# Altium PCB Robot_POWER.PcbDoc (part 3 of 3)
Units mil, origin at the board's own origin, x right, y up, seen from the top; angles counter-clockwise.
Board outline 5791.97 x 4531.5 mil, 4 copper layers (Top Layer, GND02, GND03, Bottom Layer), stack 23.756 mil thick; 192 components, 81 nets, 533 pads, 1202 vias.
Unrouted connection lines stored in the file: 18.
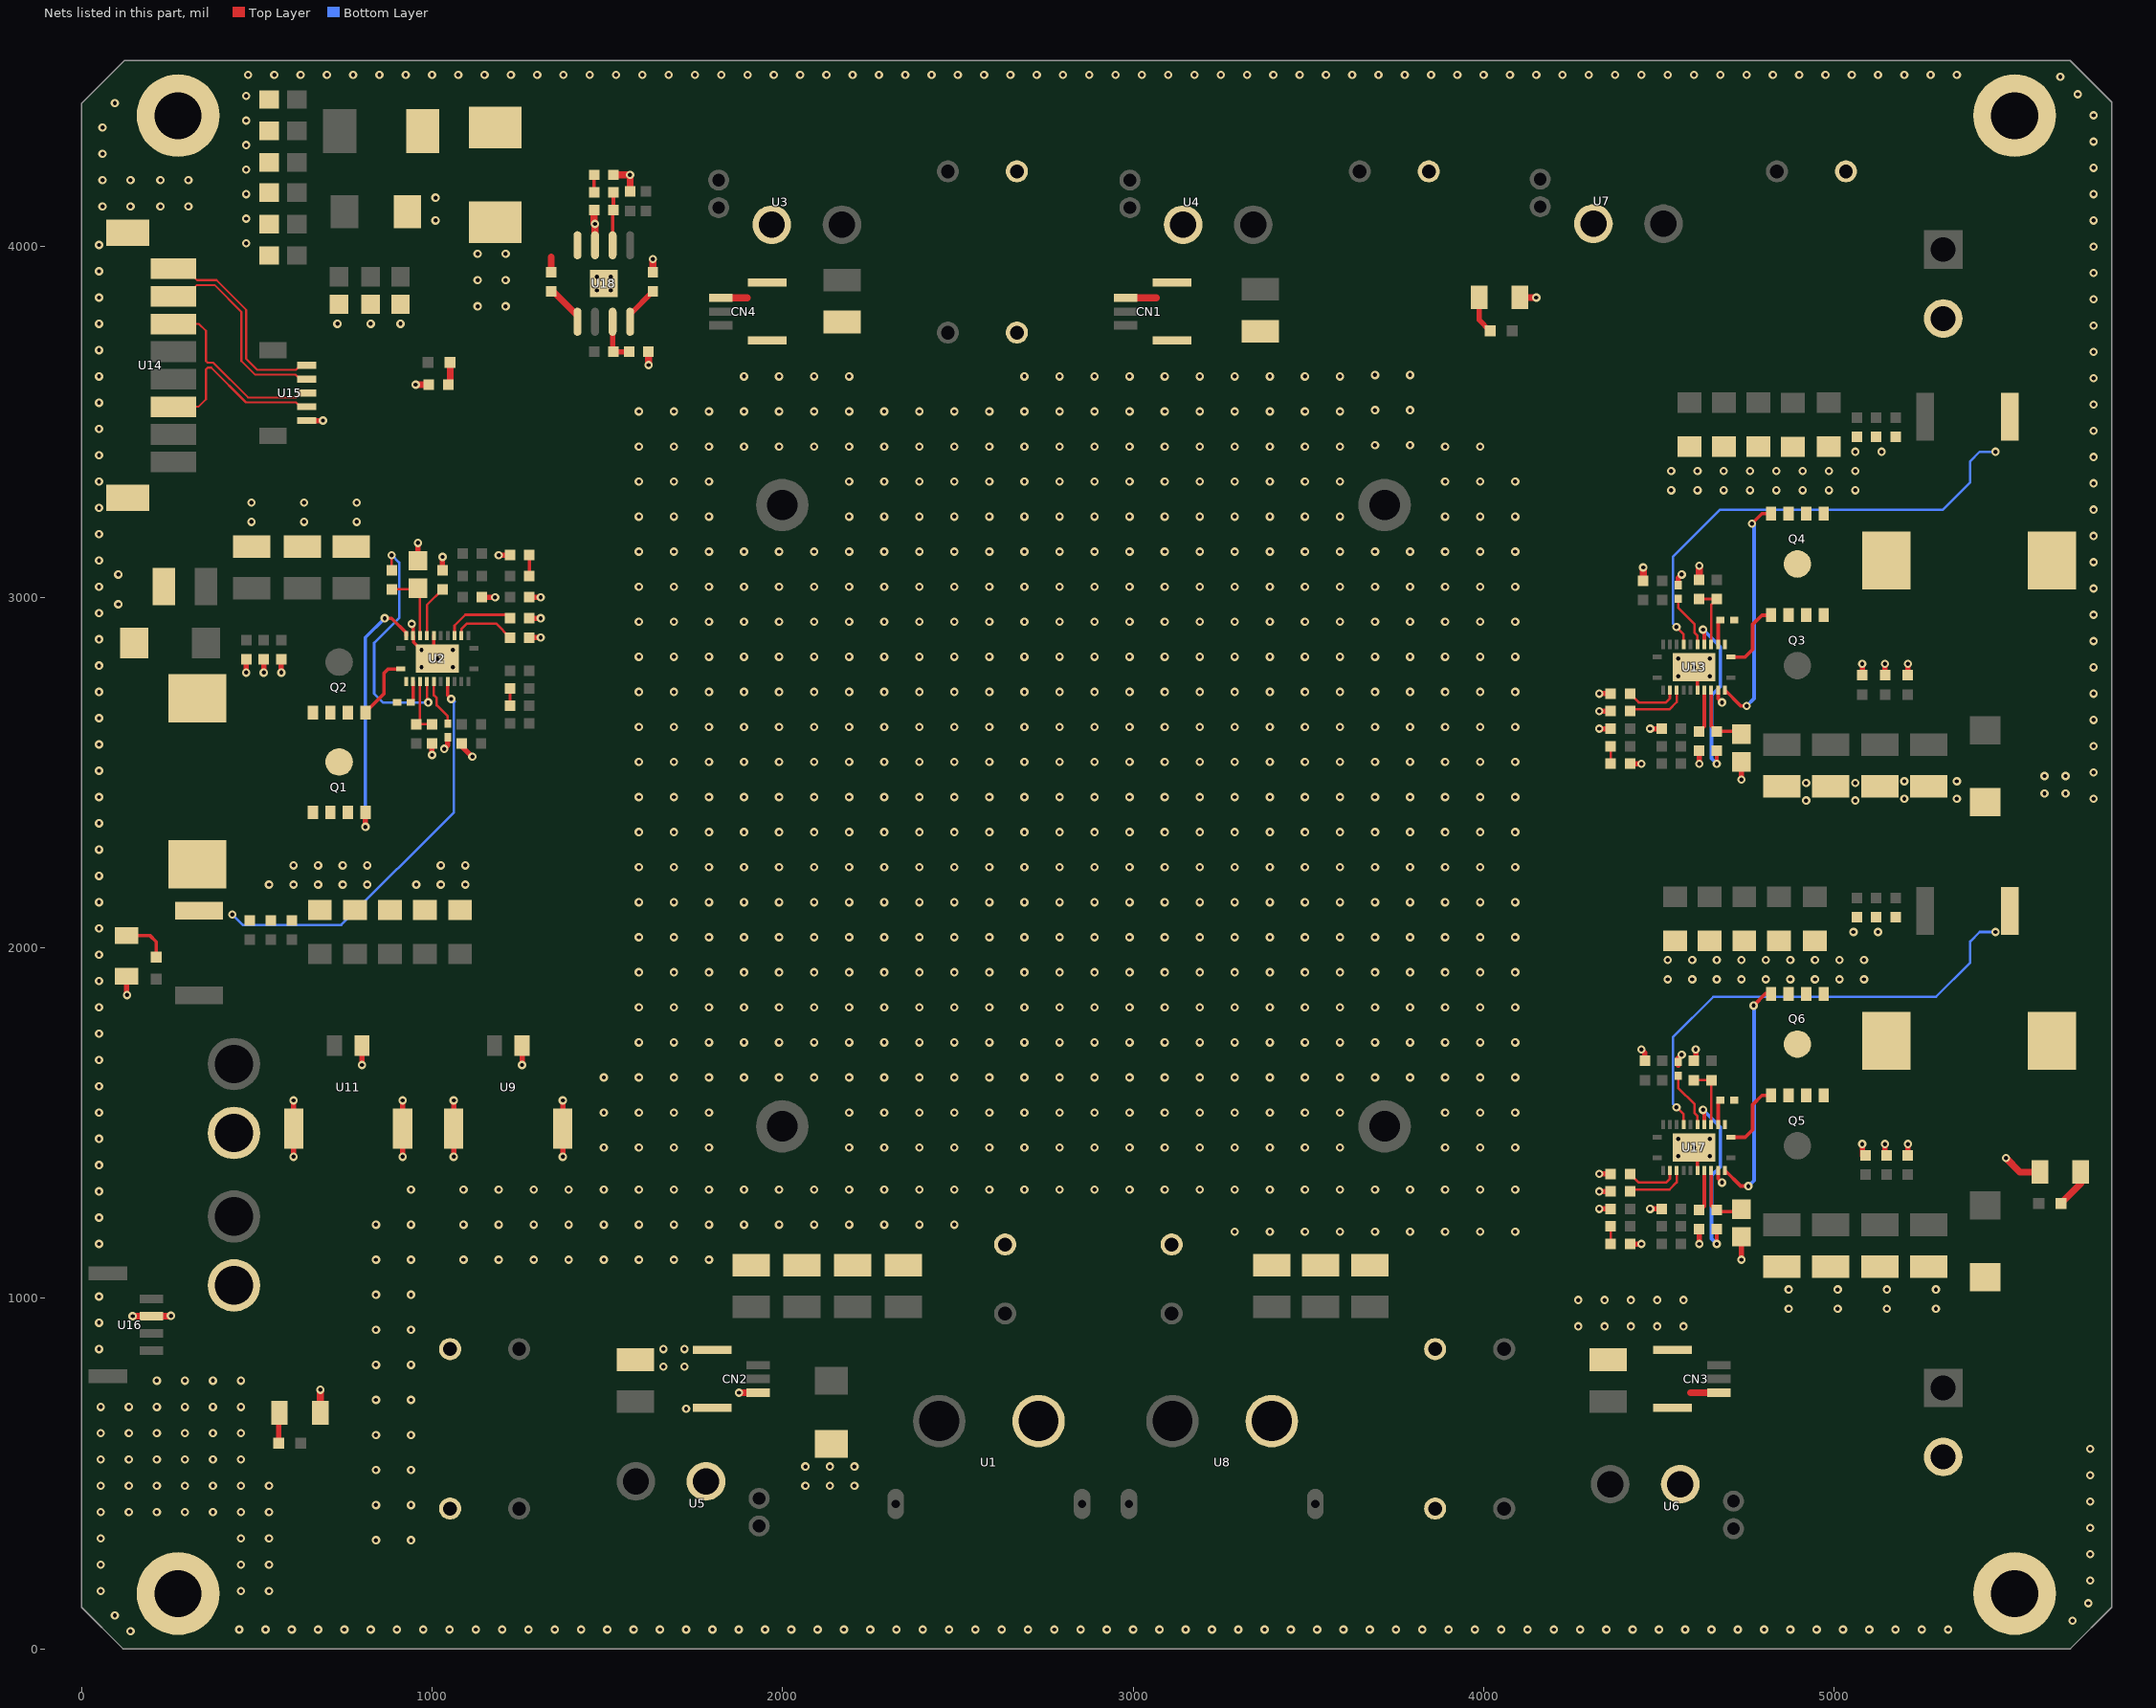
[diagram p4: the nets of this part, all layers, seen from the top]

## Via types
v1: diameter 24, hole 12, Top Layer to Bottom Layer, tented both sides, 1202 vias

## Nets (pads, with @x,y where several pads share a name; then routed paths per layer and width w, separated by ;. In a path a pad name is that pad's centre, name@x,y a point inside that pad or via, vN(x,y) a via of type N, cw(c..) or ccw(c..) an arc to the next point about the centre after c; other vN are vias at no path point) (continued)
GND: C2.1 C3.1 C4.1 C5.1 C6.1 C7.1 C8.1 C9.1 C10.1 C11.1 C12.1 C13.2 C14.2 C15.2 C16.2 C17.2 C18.2 C19.2 C20.2 C21.2 C22.2 C23.2 C24.1 C25.1 C26.2 C27.2 C28.2 C29.2 C30.1 C32.1 C33.1 C34.1 C35.2 C36.2 C37.2 C38.2 C39.2 C40.2 C42.2 C43.1 C44.2 C45.1 C46.1 C47.2 C48.2 C49.2 C50.2 C51.1 C53.1 C54.1 C55.1 C56.2 C57.2 C58.2 C59.2 C60.2 C61.2 C62.2 C64.1 C65.2 C66.1 C67.1 C68.2 C69.2 C70.2 C71.2 C72.1 C75.1 C76.1 C77.1 C78.2 C79.2 C80.2 C81.2 C82.2 C83.1 C84.1 C85.1 C86.1 C87.1 C88.1 C89.1 C90.1 C91.1 C92.2 C94.2 C95.1 C96.1 C97.1 CN1.1 CN1.4 CN1.5 CN2.1 CN2.4 CN2.5 CN3.1 CN3.4 CN3.5 CN4.1 CN4.4 CN4.5 D1.2 D2.2 D3.2 D4.2 D5.2 D6.1 pad.0 Q1.1 Q1.2 Q1.3 Q4.1 Q4.2 Q4.3 Q6.1 Q6.2 Q6.3 R8.2 R11.2 R12.1 R13.2 R14.2 R15.2 R21.2 R22.2 R24.1 R25.2 R26.2 R27.2 R28.2 R29.2 R30.2 R31.2 R32.2 R37.2 R43.2 R44.1 R45.1 R46.1 R47.1 R48.2 R49.2 R50.2 U1.1 U2.7 U2.10 U2.25 U3.2 U4.2 U5.2 U6.2 U7.2 U8.1 U9.2 U9.3 U9.4 U10.1 U11.2 U11.3 U11.4 U12.2 U13.7 U13.10 U13.25 U14.9 U14.10 U15.1 U16.2 U17.7 U17.10 U17.25 U18.7 U18.9 U19.2 U20.1 | length 3597.9
  Top Layer w10: v1(942.3,2923.9) 946.1,2923.9 U2.10@946.1,2890.2 947.3,2889 947.3,2871.72 985.97,2833.05 U2.25@1003.25,2833.05 ; U2.25@1005.1,2834.9 U2.7@1005.1,2890.2 ; v1(4600,1430) 4609.9,1420.1 U17.7@4609.9,1364.8 ; v1(4600,2800) 4609.9,2790.1 U13.7@4609.9,2734.8 ; U17.10@4668.9,1364.8 4668.9,1341.1 v1(4680,1330) ; U13.10@4668.9,2734.8 4668.9,2711.1 v1(4680,2700)
  Top Layer w15: v1@128.05,1866.99 R30.2@128.05,1918.79 ; v1(470,2785) C25.1@470,2822.5 ; v1(520,2785) C24.1@520,2822.5 ; v1(570,2785) C30.1@570,2822.5 ; v1(605.18,1403.7) U11.3@605.21,1484.25 v1(605.21,1564.58) ; U15.1@642.69,3503.98 v1(688.98,3503.98) ; v1(800.09,1665.54) U11.2@800.09,1720.47 ; v1(916.2,1403.7) U11.4@916.23,1484.25 v1(916.23,1564.58) ; C23.2@960,3104.37 v1(960,3155) ; v1(999.99,2550.01) R12.1@1000,2582.5 ; C43.1@1030,3077.5 v1(1030,3115) ; v1(1034.71,2567.54) 1045,2577.83 R11.2@1045,2600.31 ; v1(1061.87,1403.7) U9.3@1061.9,1484.25 v1(1061.9,1564.58) ; R8.2@1085,2582.5 1085,2575 v1(1115,2545) ; R13.2@1142.5,3000 v1(1180,3000) ; v1(1190,3120) C40.2@1222.5,3120 ; v1(1256.78,1665.54) U9.2@1256.78,1720.47 ; R14.2@1277.5,2885 v1(1310,2885) ; R15.2@1277.5,2940 v1(1310,2940) ; C42.2@1277.5,3000 v1(1310,3000) ; v1(1372.89,1403.7) U9.4@1372.92,1484.25 v1(1372.92,1564.58) ; v1(4330,1255) C94.2@4362.5,1255 ; v1(4330,1305) R50.2@4362.5,1305 ; v1(4330,1355) R49.2@4362.5,1355 ; v1(4330,2625) C62.2@4362.5,2625 ; v1(4330,2675) R28.2@4362.5,2675 ; v1(4330,2725) R27.2@4362.5,2725 ; C92.2@4417.5,1155 v1(4450,1155) ; C61.2@4417.5,2525 v1(4450,2525) ; v1(4450,1710) 4460,1700 R37.2@4460,1677.5 ; v1(4475,1255) R48.2@4507.5,1255 ; v1(4475,2625) R25.2@4507.5,2625 ; R43.2@4555,1664.69 4555,1685 v1(4565,1695) ; R22.2@4555,3034.69 4555,3055 v1(4565,3065) ; R45.1@4600,1677.5 4605,1682.51 v1(4605,1710) ; v1(4615,1155) C97.1@4615,1192.5 ; v1(4615,2525) C64.1@4615,2562.5 ; v1(4735,1110) C65.2@4735,1160.63 ; v1(4735,2480) C44.2@4735,2530.63 ; C72.1@5080,1407.5 v1(5080,1440) ; C45.1@5080,2777.5 v1(5080,2810) ; C66.1@5145,1407.5 v1(5145,1440) ; C51.1@5145,2777.5 v1(5145,2810) ; C67.1@5210,1407.5 v1(5210,1440) ; C46.1@5210,2777.5 v1(5210,2810)
  Top Layer w20: v1(146.02,948.98) U16.2@199.81,948.98 253.98,948.98 v1(255,950) ; R26.2@681.1,673.23 v1(681.1,738.9) ; v1(953.51,3606.49) R29.2@991,3606.49 ; C95.1@1462.5,4105 1462.5,4067.5 v1(1465,4065) U18.7@1465,4004.1 ; C96.1@1517.5,4205 v1(1565,4204.99) R46.1@1565,4157.5 ; v1(1617.5,3662.5) R47.1@1617.5,3700 ; R44.1@1630,3927.5 v1(1630,3965) ; CN4.1@1824.05,3854.37 1899.37,3854.37 ; v1(1875.63,730.63) CN2.1@1930.95,730.63 ; CN1.1@2979.06,3854.37 3065.63,3854.37 ; R31.2@4103.2,3855 v1(4150,3855) ; R21.2@4455,3047.5 v1(4455,3085) ; 4590.63,730.63 CN3.1@4670.94,730.63 ; R24.1@4615,3050 v1(4615,3090) ; v1(5490,1400) 5530,1360 R32.2@5586.8,1360
  Bottom Layer w10: v1(942.3,2923.9) v1@943.9,2923.9
  other v1: 140,50 450,55 525,55 600,55 675,55 750,55 825,55 900,55 975,55 1050,55 1125,55 1200,55 1275,55 1350,55 1425,55 1500,55 1575,55 1650,55 1725,55 1800,55 1875,55 1950,55 2025,55 2100,55 2175,55 2250,55 2325,55 2400,55 2475,55 2550,55 2625,55 2700,55 2775,55 2850,55 2925,55 3000,55 3075,55 3150,55 3225,55 3300,55 3375,55 3450,55 3525,55 3600,55 3675,55 3750,55 3825,55 3900,55 3975,55 4050,55 4125,55 4200,55 4275,55 4350,55 4425,55 4500,55 4575,55 4650,55 4725,55 4800,55 4875,55 4950,55 5025,55 5100,55 5175,55 5250,55 5325,55 5680,80 95,95 5725,130 55,165 455,165 535,165 5730,195 55,240 455,240 535,240 5730,270 840,310 940,310 55,315 455,315 535,315 5730,345 55,390 135,390 215,390 295,390 375,390 455,390 535,390 840,410 940,410 5730,420 55,465 135,465 215,465 295,465 375,465 455,465 535,465 2065,465 2135,465 2205,465 5730,495 840,510 940,510 2065,520 2135,520 2205,520 55,540 135,540 215,540 295,540 375,540 455,540 5730,570 840,610 940,610 55,615 135,615 215,615 295,615 375,615 455,615 1725,685 55,690 135,690 215,690 295,690 375,690 455,690 840,710 940,710 215,765 295,765 375,765 455,765 1660,805 1720,805 840,810 940,810 50,855 1660,855 1720,855 840,910 940,910 4270,920 4345,920 4420,920 4495,920 4570,920 50,930 4870,970 5010,970 5150,970 5290,970 4270,995 4345,995 4420,995 4495,995 4570,995 50,1005 840,1010 940,1010 4870,1025 5010,1025 5150,1025 5290,1025 840,1110 940,1110 1090,1110 1190,1110 1290,1110 1390,1110 1490,1110 1590,1110 1690,1110 1790,1110 50,1155 3290,1190 3390,1190 3490,1190 3590,1190 3690,1190 3790,1190 3890,1190 3990,1190 4090,1190 840,1210 940,1210 1090,1210 1190,1210 1290,1210 1390,1210 1490,1210 1590,1210 1690,1210 1790,1210 1890,1210 1990,1210 2090,1210 2190,1210 2290,1210 2390,1210 2490,1210 50,1230 50,1305 940,1310 1090,1310 1190,1310 1290,1310 1390,1310 1490,1310 1590,1310 1690,1310 1790,1310 1890,1310 1990,1310 2090,1310 2190,1310 2290,1310 2390,1310 2490,1310 2590,1310 2690,1310 2790,1310 2890,1310 2990,1310 3090,1310 3190,1310 3290,1310 3390,1310 3490,1310 3590,1310 3690,1310 3790,1310 3890,1310 3990,1310 4090,1310 50,1380 4555,1405 4645,1405 1490,1430 1590,1430 1690,1430 1790,1430 2190,1430 2290,1430 2390,1430 2490,1430 2590,1430 2690,1430 2790,1430 2890,1430 2990,1430 3090,1430 3190,1430 3290,1430 3390,1430 3490,1430 3590,1430 3890,1430 3990,1430 4090,1430 50,1455 4555,1455 4645,1455 50,1530 1490,1530 1590,1530 1690,1530 1790,1530 2190,1530 2290,1530 2390,1530 2490,1530 2590,1530 2690,1530 2790,1530 2890,1530 2990,1530 3090,1530 3190,1530 3290,1530 3390,1530 3490,1530 3590,1530 3890,1530 3990,1530 4090,1530 50,1605 1490,1630 1590,1630 1690,1630 1790,1630 1890,1630 1990,1630 2090,1630 2190,1630 2290,1630 2390,1630 2490,1630 2590,1630 2690,1630 2790,1630 2890,1630 2990,1630 3090,1630 3190,1630 3290,1630 3390,1630 3490,1630 3590,1630 3690,1630 3790,1630 3890,1630 3990,1630 4090,1630 50,1680 1590,1730 1690,1730 1790,1730 1890,1730 1990,1730 2090,1730 2190,1730 2290,1730 2390,1730 2490,1730 2590,1730 2690,1730 2790,1730 2890,1730 2990,1730 3090,1730 3190,1730 3290,1730 3390,1730 3490,1730 3590,1730 3690,1730 3790,1730 3890,1730 3990,1730 4090,1730 50,1755 50,1830 1590,1830 1690,1830 1790,1830 1890,1830 1990,1830 2090,1830 2190,1830 2290,1830 2390,1830 2490,1830 2590,1830 2690,1830 2790,1830 2890,1830 2990,1830 3090,1830 3190,1830 3290,1830 3390,1830 3490,1830 3590,1830 3690,1830 3790,1830 3890,1830 3990,1830 4090,1830 130,1865 50,1905 4525,1910 4595,1910 4665,1910 4735,1910 4805,1910 4875,1910 4945,1910 5015,1910 5085,1910 1590,1930 1690,1930 1790,1930 1890,1930 1990,1930 2090,1930 2190,1930 2290,1930 2390,1930 2490,1930 2590,1930 2690,1930 2790,1930 2890,1930 2990,1930 3090,1930 3190,1930 3290,1930 3390,1930 3490,1930 3590,1930 3690,1930 3790,1930 3890,1930 3990,1930 4090,1930 4525,1965 4595,1965 4665,1965 4735,1965 4805,1965 4875,1965 4945,1965 5015,1965 5085,1965 50,1980 1590,2030 1690,2030 1790,2030 1890,2030 1990,2030 2090,2030 2190,2030 2290,2030 2390,2030 2490,2030 2590,2030 2690,2030 2790,2030 2890,2030 2990,2030 3090,2030 3190,2030 3290,2030 3390,2030 3490,2030 3590,2030 3690,2030 3790,2030 3890,2030 3990,2030 4090,2030 5055,2045 5125,2045 50,2055 50,2130 1590,2130 1690,2130 1790,2130 1890,2130 1990,2130 2090,2130 2190,2130 2290,2130 2390,2130 2490,2130 2590,2130 2690,2130 2790,2130 2890,2130 2990,2130 3090,2130 3190,2130 3290,2130 3390,2130 3490,2130 3590,2130 3690,2130 3790,2130 3890,2130 3990,2130 4090,2130 535,2180 605,2180 675,2180 745,2180 815,2180 955,2180 1025,2180 1095,2180 50,2205 1590,2230 1690,2230 1790,2230 1890,2230 1990,2230 2090,2230 2190,2230 2290,2230 2390,2230 2490,2230 2590,2230 2690,2230 2790,2230 2890,2230 2990,2230 3090,2230 3190,2230 3290,2230 3390,2230 3490,2230 3590,2230 3690,2230 3790,2230 3890,2230 3990,2230 4090,2230 605,2235 675,2235 745,2235 815,2235 1025,2235 1095,2235 50,2280 1590,2330 1690,2330 1790,2330 1890,2330 1990,2330 2090,2330 2190,2330 2290,2330 2390,2330 2490,2330 2590,2330 2690,2330 2790,2330 2890,2330 2990,2330 3090,2330 3190,2330 3290,2330 3390,2330 3490,2330 3590,2330 3690,2330 3790,2330 3890,2330 3990,2330 4090,2330 50,2355 4920,2420 5060,2420 5200,2425 5350,2425 5740,2425 50,2430 1590,2430 1690,2430 1790,2430 1890,2430 1990,2430 2090,2430 2190,2430 2290,2430 2390,2430 2490,2430 2590,2430 2690,2430 2790,2430 2890,2430 2990,2430 3090,2430 3190,2430 3290,2430 3390,2430 3490,2430 3590,2430 3690,2430 3790,2430 3890,2430 3990,2430 4090,2430 5600,2440 5660,2440 4920,2470 5060,2470 5200,2475 5350,2475 5600,2490 5660,2490 5740,2500 50,2505 1590,2530 1690,2530 1790,2530 1890,2530 1990,2530 2090,2530 2190,2530 2290,2530 2390,2530 2490,2530 2590,2530 2690,2530 2790,2530 2890,2530 2990,2530 3090,2530 3190,2530 3290,2530 3390,2530 3490,2530 3590,2530 3690,2530 3790,2530 3890,2530 3990,2530 4090,2530 5740,2575 50,2580 1590,2630 1690,2630 1790,2630 1890,2630 1990,2630 2090,2630 2190,2630 2290,2630 2390,2630 2490,2630 2590,2630 2690,2630 2790,2630 2890,2630 2990,2630 3090,2630 3190,2630 3290,2630 3390,2630 3490,2630 3590,2630 3690,2630 3790,2630 3890,2630 3990,2630 4090,2630 5740,2650 50,2655 5740,2725 50,2730 1590,2730 1690,2730 1790,2730 1890,2730 1990,2730 2090,2730 2190,2730 2290,2730 2390,2730 2490,2730 2590,2730 2690,2730 2790,2730 2890,2730 2990,2730 3090,2730 3190,2730 3290,2730 3390,2730 3490,2730 3590,2730 3690,2730 3790,2730 3890,2730 3990,2730 4090,2730 4555,2775 4645,2775 970,2800 1060,2800 5740,2800 50,2805 1015,2825 4555,2825 4645,2825 1590,2830 1690,2830 1790,2830 1890,2830 1990,2830 2090,2830 2190,2830 2290,2830 2390,2830 2490,2830 2590,2830 2690,2830 2790,2830 2890,2830 2990,2830 3090,2830 3190,2830 3290,2830 3390,2830 3490,2830 3590,2830 3690,2830 3790,2830 3890,2830 3990,2830 4090,2830 970,2850 1060,2850 5740,2875 50,2880 1590,2930 1690,2930 1790,2930 1890,2930 1990,2930 2090,2930 2190,2930 2290,2930 2390,2930 2490,2930 2590,2930 2690,2930 2790,2930 2890,2930 2990,2930 3090,2930 3190,2930 3290,2930 3390,2930 3490,2930 3590,2930 3690,2930 3790,2930 3890,2930 3990,2930 4090,2930 5740,2950 50,2955 105,2980 5740,3025 50,3030 1590,3030 1690,3030 1790,3030 1890,3030 1990,3030 2090,3030 2190,3030 2290,3030 2390,3030 2490,3030 2590,3030 2690,3030 2790,3030 2890,3030 2990,3030 3090,3030 3190,3030 3290,3030 3390,3030 3490,3030 3590,3030 3690,3030 3790,3030 3890,3030 3990,3030 4090,3030 105,3065 5740,3100 50,3105 1590,3130 1690,3130 1790,3130 1890,3130 1990,3130 2090,3130 2190,3130 2290,3130 2390,3130 2490,3130 2590,3130 2690,3130 2790,3130 2890,3130 2990,3130 3090,3130 3190,3130 3290,3130 3390,3130 3490,3130 3590,3130 3690,3130 3790,3130 3890,3130 3990,3130 4090,3130 5740,3175 50,3180 485,3215 635,3215 785,3215 1590,3230 1690,3230 1790,3230 2190,3230 2290,3230 2390,3230 2490,3230 2590,3230 2690,3230 2790,3230 2890,3230 2990,3230 3090,3230 3190,3230 3290,3230 3390,3230 3490,3230 3590,3230 3890,3230 3990,3230 4090,3230 5740,3250 50,3255 485,3270 635,3270 785,3270 4535,3305 4610,3305 4685,3305 4760,3305 4835,3305 4910,3305 4985,3305 5060,3305 5740,3325 50,3330 1590,3330 1690,3330 1790,3330 2190,3330 2290,3330 2390,3330 2490,3330 2590,3330 2690,3330 2790,3330 2890,3330 2990,3330 3090,3330 3190,3330 3290,3330 3390,3330 3490,3330 3590,3330 3890,3330 3990,3330 4090,3330 4535,3360 4610,3360 4685,3360 4760,3360 4835,3360 4910,3360 4985,3360 5060,3360 5740,3400 50,3405 5060,3415 5135,3415 1590,3430 1690,3430 1790,3430 1890,3430 1990,3430 2090,3430 2190,3430 2290,3430 2390,3430 2490,3430 2590,3430 2690,3430 2790,3430 2890,3430 2990,3430 3090,3430 3190,3430 3290,3430 3390,3430 3490,3430 3590,3430 3890,3430 3990,3430 3690,3433.98 3790,3433.98 5740,3475 50,3480 1590,3530 1690,3530 1790,3530 1890,3530 1990,3530 2090,3530 2190,3530 2290,3530 2390,3530 2490,3530 2590,3530 2690,3530 2790,3530 2890,3530 2990,3530 3090,3530 3190,3530 3290,3530 3390,3530 3490,3530 3590,3530 3690,3533.98 3790,3533.98 5740,3550 50,3555 5740,3625 50,3630 1890,3630 1990,3630 2090,3630 2190,3630 2690,3630 2790,3630 2890,3630 2990,3630 3090,3630 3190,3630 3290,3630 3390,3630 3490,3630 3590,3630 3690,3633.98 3790,3633.98 5740,3700 50,3705 5740,3775 50,3780 730,3780 825,3780 910,3780 1130,3830 1210,3830 5740,3850 50,3855 1470.3,3875.3 1509.7,3875.3 1130,3905 1210,3905 1470.3,3914.7 1509.7,3914.7 5740,3925 50,3930 1130,3980 1210,3980 5740,4000 50,4005 470,4010 1010,4075 5740,4075 470,4080 60,4115 140,4115 225,4115 305,4115 1010,4140 470,4150 5740,4150 60,4190 140,4190 225,4190 305,4190 470,4220 5740,4225 60,4265 470,4290 5740,4300 60,4340 470,4360 5740,4375 95,4410 470,4430 5695,4435 5645,4485 475,4490 550,4490 625,4490 700,4490 775,4490 850,4490 925,4490 1000,4490 1075,4490 1150,4490 1225,4490 1300,4490 1375,4490 1450,4490 1525,4490 1600,4490 1675,4490 1750,4490 1825,4490 1900,4490 1975,4490 2050,4490 2125,4490 2200,4490 2275,4490 2350,4490 2425,4490 2500,4490 2575,4490 2650,4490 2725,4490 2800,4490 2875,4490 2950,4490 3025,4490 3100,4490 3175,4490 3250,4490 3325,4490 3400,4490 3475,4490 3550,4490 3625,4490 3700,4490 3775,4490 3850,4490 3925,4490 4000,4490 4075,4490 4150,4490 4225,4490 4300,4490 4375,4490 4450,4490 4525,4490 4600,4490 4675,4490 4750,4490 4825,4490 4900,4490 4975,4490 5050,4490 5125,4490 5200,4490 5275,4490 5350,4490
HO1: Q2.4 U2.13 | length 186.4
  Top Layer w10: Q2.4@810,2671.2 862.55,2723.75 862.55,2782.95 875,2795.4 U2.13@910.3,2795.4
HO2: Q3.4 U13.13 | length 206.6
  Top Layer w10: U13.13@4704.7,2829.6 4746.23,2829.6 4767.53,2850.9 4767.53,2922.53 4793.8,2948.8 Q3.4@4820,2948.8
HO3: Q5.4 U17.13 | length 206.6
  Top Layer w10: U17.13@4704.7,1459.6 4746.23,1459.6 4767.53,1480.9 4767.53,1552.53 4793.8,1578.8 Q5.4@4820,1578.8
LO1: Q1.4 U2.11 | length 745.9
  Top Layer w10: v1(865,2940) 885,2940 926.4,2898.6 U2.11@926.4,2890.2
  Top Layer w15: v1(810,2345) Q1.4@810,2386.2
  Bottom Layer w10: v1(810,2345) 810,2885 v1(865,2940)
LO2: Q4.4 U13.11 | length 678.2
  Top Layer w10: U13.11@4688.6,2734.8 4733.4,2690 v1(4750,2690) ; v1(4765,3210) 4793.8,3238.8 Q4.4@4820,3238.8
  Bottom Layer w10: v1(4750,2690) 4771.2,2711.2 4771.2,3203.8 v1(4765,3210)
LO3: Q6.4 U17.11 | length 671.2
  Top Layer w10: U17.11@4688.6,1364.8 4733.4,1320 v1(4755,1320) ; v1(4770,1835) 4803.8,1868.8 Q6.4@4820,1868.8
  Bottom Layer w10: v1(4755,1320) 4771.2,1336.2 4771.2,1833.8 v1(4770,1835)
NetC1_2: C1.2 R1.1 | length 50
  Top Layer w7: R1.1@1222.5,2690 C1.2@1222.5,2740
NetC23_1: C23.1 R4.2 U2.9 | length 214.1
  Top Layer w7: R4.2@885,3022.5 956.87,3022.5 C23.1@960,3025.63 965.8,3019.83 U2.9@965.8,2890.2
NetC31_2: C31.2 U2.15 | length 62.4
  Top Layer w10: C31.2@939.69,2700 946.1,2706.41 U2.15@946.1,2759.7
NetC40_1: C40.1 R9.2 | length 60
  Top Layer w10: R9.2@1277.5,3060 C40.1@1277.5,3120
NetC44_1: C44.1 R16.2 U13.9 | length 197.2
  Top Layer w10: U13.9@4649.2,2734.8 4649.2,2633.3 R16.2@4665,2617.5 4726.87,2617.5 C44.1@4735,2609.37
NetC52_2: C52.2 U13.15 | length 72.4
  Top Layer w10: U13.15@4668.9,2865.3 4668.9,2928.59 C52.2@4675.31,2935
NetC61_1: C61.1 R20.2 | length 50
  Top Layer w7: C61.1@4362.5,2525 R20.2@4362.5,2575
NetC65_1: C65.1 R33.2 U17.9 | length 197.2
  Top Layer w10: U17.9@4649.2,1364.8 4649.2,1263.3 4665,1247.5 4726.87,1247.5 C65.1@4735,1239.37
NetC73_2: C73.2 U17.15 | length 72.4
  Top Layer w10: U17.15@4668.9,1495.3 4668.9,1558.59 C73.2@4675.31,1565
NetC74_1: C74.1 U18.1 | length 120.7
  Top Layer w20: C74.1@1340,3872.5 1345.32,3872.5 1415,3802.82 U18.1@1415,3786
NetC74_2: C74.2 D5.1 L4.1 U18.8 | length 42.5
  Top Layer w20: C74.2@1340,3927.5 1340,3970
NetC92_1: C92.1 R39.2 | length 50
  Top Layer w7: C92.1@4362.5,1155 R39.2@4362.5,1205
NetC95_2: C95.2 R42.2 U18.6 | length 151.9
  Top Layer w10: U18.6@1515,4004.1 1515,4102.5 C95.2@1517.5,4105 R42.2@1517.5,4155
NetC96_2: C96.2 R42.1 | length 50
  Top Layer w10: R42.1@1462.5,4155 C96.2@1462.5,4205
NetL1_2: L1.2 R5.2 U2.20 | length 1159.1
  Top Layer w10: U2.20@1044.5,2759.7 1044.5,2727.84 1044.54,2727.8 1044.54,2725.17 1044.74,2724.97 1044.74,2719.84 v1(1054.72,2709.86)
  Bottom Layer w7: v1(430,2095) 460,2065 741.27,2065 1062.74,2386.48 v1@1062.74,2701.84
  Bottom Layer w10: v1(1054.72,2709.86) v1@1062.74,2701.84
NetL2_2: L2.2 R17.2 U13.20 | length 1342.1
  Top Layer w7: v1(4550,2915) 4570.5,2894.5 U13.20@4570.5,2865.3
  Bottom Layer w7: v1(4550,2915) 4539.59,2925.41 4539.59,3114.59 4675,3250 5310,3250 5387.87,3327.87 5387.87,3387.87 5415,3415 v1(5460,3415)
NetL3_2: L3.2 R35.2 U17.20 | length 1342.1
  Top Layer w7: v1(4550,1545) 4570.5,1524.5 U17.20@4570.5,1495.3
  Bottom Layer w7: v1(4550,1545) 4539.59,1555.41 4539.59,1744.59 4655,1860 5290,1860 5387.87,1957.87 5387.87,2017.87 5415,2045 v1(5460,2045)
NetLED1_1: LED1.1 R26.1 | length 87.6
  Top Layer w15: LED1.1@563.02,586.34 563.02,671.55 R26.1@564.7,673.23
NetLED2_1: LED2.1 R29.1 | length 66.3
  Top Layer w20: R29.1@1046,3606.49 1051.77,3612.27 LED2.1@1051.77,3670.39
NetLED3_1: LED3.1 R30.1 | length 136
  Top Layer w10: R30.1@128.05,2035.19 194.85,2035.19 212.92,2017.12 LED3.1@212.92,1973.47
NetLED4_1: LED4.1 R31.1 | length 108.3
  Top Layer w15: R31.1@3986.8,3855 3986.8,3791.59 LED4.1@4018.52,3759.86
NetLED5_1: LED5.1 R32.1 | length 113.4
  Top Layer w20: LED5.1@5646.48,1270.14 5703.2,1326.86 R32.1@5703.2,1360
NetR7_1: R7.1 R12.2 U2.16 | length 171.7
  Top Layer w7: U2.16@965.8,2759.7 965.8,2648.29 R7.1@955,2637.5 R12.2@1000,2637.5
NetR11_1: R11.1 U2.18 | length 136.5
  Top Layer w7: U2.18@1005.1,2759.7 1005.1,2720.06 1013.24,2711.92 1013.24,2691.76 1045,2660 R11.1@1045,2639.68
NetR14_1: R14.1 U2.3 | length 180.5
  Top Layer w7: U2.3@1083.9,2890.2 1083.9,2908.9 1100,2925 1182.51,2925 R14.1@1222.5,2885
NetR15_1: R15.1 U2.4 | length 219.2
  Top Layer w7: U2.4@1064.2,2890.2 1064.2,2919.2 1095,2950 R15.1@1227.51,2950 ; R15.1@1212.51,2950 R15.1@1222.5,2940
NetR19_1: R19.1 R24.2 U13.16 | length 186.2
  Top Layer w7: R24.2@4615,2995 R19.1@4665,2995 4649.2,2979.2 U13.16@4649.2,2865.3
NetR22_1: R22.1 U13.18 | length 152.8
  Top Layer w7: R22.1@4555,2995.31 4555,2970 4601.8,2923.2 4601.8,2898.2 4609.9,2890.1 U13.18@4609.9,2865.3
NetR27_1: R27.1 U13.3 | length 152.3
  Top Layer w7: R27.1@4417.5,2725 4442.49,2700 4520,2700 4531.1,2711.1 U13.3@4531.1,2734.8
NetR28_1: R28.1 U13.4 | length 178
  Top Layer w7: R28.1@4417.5,2675 4422.5,2680 4530,2680 4550.8,2700.8 U13.4@4550.8,2734.8
NetR36_1: R36.1 R45.2 U17.16 | length 177.5
  Top Layer w7: R45.2@4600,1622.5 R36.1@4650,1622.5 4649.2,1621.69 U17.16@4649.2,1495.3
NetR40_1: R40.1 R47.2 U18.3 | length 132
  Top Layer w15: U18.3@1515,3786 1515,3702.49 R40.1@1517.5,3700 R47.2@1562.5,3700
NetR43_1: R43.1 U17.18 | length 152.8
  Top Layer w7: R43.1@4555,1625.32 4555,1600 4601.8,1553.2 4601.8,1528.2 4609.9,1520.1 U17.18@4609.9,1495.3
NetR44_2: R44.2 U18.4 | length 113.4
  Top Layer w15: U18.4@1565,3786 1565,3807.49 R44.2@1630,3872.5
NetR49_1: R49.1 U17.3 | length 152.3
  Top Layer w7: R49.1@4417.5,1355 4442.49,1330 4520,1330 4531.1,1341.1 U17.3@4531.1,1364.8
NetR50_1: R50.1 U17.4 | length 178
  Top Layer w7: R50.1@4417.5,1305 4422.5,1310 4530,1310 4550.8,1330.8 U17.4@4550.8,1364.8
PG12: R4.1 U2.17 | length 702.2
  Top Layer w7: R4.1@885,3077.5 v1(885,3120) ; U2.17@985.4,2759.7 985.4,2705.4 984.65,2704.65 v1(989.3,2700)
  Bottom Layer w7: v1(885,3120) 906,3099 906,2941 835,2870 835,2725 860,2700 v1(989.3,2700)
PG16-2: R16.1 U13.17 | length 500.9
  Top Layer w10: v1(4625.7,2907.53) 4629.6,2903.63 U13.17@4629.6,2865.3 ; v1(4665,2525) R16.1@4665,2562.5
  Bottom Layer w10: v1(4625.7,2907.53) 4675,2858.23 4675,2745 4650,2720 4650,2540 v1(4665,2525)
PG16-3: R33.1 U17.17 | length 500.9
  Top Layer w10: v1(4625.7,1537.53) 4629.6,1533.63 U17.17@4629.6,1495.3 ; v1(4665,1155) R33.1@4665,1192.5
  Bottom Layer w10: v1(4625.7,1537.53) 4675,1488.23 4675,1375 4650,1350 4650,1170 v1(4665,1155)
RXN: U14.6 U15.2 | length 523.1
  Top Layer w6: U14.6@261.85,3543.32 333.32,3543.32 355,3565 355,3650 360,3655 370.2,3655 469.17,3556.03 612,3556.03 624.65,3543.38 U15.2@642.69,3543.38
RXP: U14.3 U15.3 | length 523.2
  Top Layer w6: U14.3@261.85,3779.52 335.48,3779.52 355,3760 355,3674 360,3669 376,3669 474.97,3570.03 611.95,3570.03 624.6,3582.68 U15.3@642.69,3582.68
SW1: C31.1 L1.1 Q1.5 Q2.1 Q2.2 Q2.3 U2.14
SW2: C52.1 L2.1 Q3.1 Q3.2 Q3.3 Q4.5 U13.14
SW3: C73.1 L3.1 Q5.1 Q5.2 Q5.3 Q6.5 U17.14
TXN: U14.2 U15.4 | length 587.3
  Top Layer w6: U14.2@261.85,3858.32 297.04,3858.32 329.39,3890.67 379.33,3890.67 456,3814 456,3674.28 495.5,3634.78 611.08,3634.78 623.78,3622.08 U15.4@642.69,3622.08
TXP: U14.1 U15.5 | length 587.3
  Top Layer w6: U14.1@261.85,3937.02 297.17,3937.02 329.52,3904.67 385.13,3904.67 470,3819.8 470,3680.07 501.3,3648.78 611.96,3648.78 624.66,3661.48 U15.5@642.69,3661.48
VDDA1: C43.2 U2.8 | length 150.8
  Top Layer w7: U2.8@985.4,2890.2 985.4,2977.9 C43.2@1030,3022.5
VDDA2: C64.2 U13.8 | length 123.3
  Top Layer w10: C64.2@4615,2617.5 4629.6,2632.1 U13.8@4629.6,2734.8
VDDA3: C97.2 U17.8 | length 123.3
  Top Layer w10: C97.2@4615,1247.5 4629.6,1262.1 U17.8@4629.6,1364.8
pads on no net: U1.3 U1.4 U2.1 U2.2 U2.22 U2.23 U2.24 U8.3 U8.4 U13.1 U13.2 U13.22 U13.23 U13.24 U14.4 U14.5 U14.7 U14.8 U15.6 U15.7 U16.5 U16.6 U17.1 U17.2 U17.22 U17.23 U17.24

## Polygon pours and split planes (outlines as drawn)
12V on Top Layer "Top Layer-12V" (solid, remove dead copper, pour order 158): 560,1655 725,1655 745,1675 745,1805 775,1835 1065,1835 1090,1810 1090,1680 1105,1665 1191.47,1665 1201.69,1675.22 1201.69,2003.31 1190,2015 655,2015 635,2035 425,2035 415,2025 415,1960 385,1930 226.54,1930 226.4,1929.86 189.86,1929.86 183.78,1923.78 183.78,1887.24 150,1853.46 150,1255 250,1155 505,1155 525,1175 525,1330 510,1345 325,1345 295,1375 295,1565 315,1585 490,1585 520,1615
NetC74_2 on Top Layer "NONET_L01_P-001" (solid, remove dead copper, pour order 40): 1395,4440 1430,4405 1430,3970 1420,3960 1330,3960 1320,3970 1320,4210 1280,4250 930,4250 920,4260 920,4415 945,4440
GND on Top Layer "Top Layer-GND 3" (solid, remove dead copper, pour order 154): 4585,655 4600,670 4600,1020 4565,1055 4320,1055 4200,1175 4200,3485 3890,3795 3210,3795 3190,3815 3190,3920 3175,3935 3065,3935 3050,3920 3050,3655 3030,3635 2890,3635 2810,3715 2810,4295 2790,4315 2645,4315 2625,4295 2625,3595 2585,3555 2330,3555 2265,3620 2265,3780 2235,3810 2080,3810 2070,3820 2070,3865 2015,3920 1900,3920 1885,3905 1885,3665 1790,3570 1540,3570 1460,3490 1460,1360 1430,1330 885,1330 790,1235 790,275 820,245 1065,245 1100,280 1100,1025 1150,1075 4040,1075 4230,885 4230,815 4260,785 4450,785 4475,760 4475,665 4485,655
16-3V on Top Layer "Top Layer-16-3V" (solid, remove dead copper, pour order 150): 5010,2130 5200,2130 5220,2110 5220,2033 5238,2015 5300,2015 5315,2030 5315,2190 5330,2205 5735,2205 5765,2235 5765,2335 5760,2340 4245,2340 4230,2325 4230,2125 4245,2110 4990,2110
16-2V on Top Layer "Top Layer-16-2V" (solid, remove dead copper, pour order 146): 4500,3520 4505,3515 5030,3515 5050,3495 5195,3495 5215,3475 5215,3410 5230,3395 5315,3395 5330,3410 5330,3610 5310,3630 5280,3630 5235,3675 5235,3850 5265,3880 5380,3880 5405,3905 5405,4100 5360,4145 5160,4145 4865,3850 4190,3850 4125,3785 4125,3625 4230,3520
GND on Top Layer "Top Layer-GND 6" (solid, remove dead copper, pour order 144): 1390,1370 1415,1395 1415,1770 1395,1790 1240,1790 1235,1785 1235,1600 1220,1585 1085,1585 1055,1615 1055,1780 1045,1790 790,1790 775,1775 775,1600 760,1585 580,1585 545,1550 360,1550 360,1549.26 346.03,1535.29 345,1535 340,1530 340,1405 354.8,1390.2 540,1390.2 575,1355.2 575,1145 555,1125 360,1125 340,1105 340,960 360,940 720,940 740,960 740,1260 850,1370
5V on Top Layer "NONET_L01_P-001" (solid, remove dead copper, pour order 72): 145,1134.89 150,1139.89 230.11,1139.89 235,1135 235,995 227.39,987.39 147.61,987.39 145,990
48V on Top Layer "Top Layer-48V" (solid, remove dead copper, pour order 48): 2010,910 2050,870 2050,730 2070.02,709.98 2185.02,709.98 2350,545 2525,545 2585,605 2585,723.36 2631.64,770 2890,770 2930,730 2930,585 2985,530 3180,530 3235,585 3235,725 3260,750 3585,750 3640,695 3640,280 3700,220 4390,220 4440,270 4440,725 4425,740 4225,740 4175,790 4175,875 4040,1010 1225,1010 1195,980 1195,150 1215,130 1605.05,130 1655,179.95 1655,705 1620,740 1515,740 1495,760 1495,895 1510,910 1850,910
GND on Top Layer "Top Layer-GND" (solid, remove dead copper, pour order 71): 835,3115 845,3125 845,3285 805,3325 325,3325 65,3325 30,3290 30,2840 48.48,2821.52 186.52,2821.52 195,2830 195,2920 219.08,2944.08 254.08,2944.08 270,2960 270,3100 285,3115
GND on Top Layer "Top Layer-GND 1" (solid, remove dead copper, pour order 63): 5115,1980 5190,2055 5190,2095 5180,2105 5050,2105 5020,2075 4505,2075 4495,2065 4495,1931.67 4495,1895 4510,1880 4775,1880 4795,1900 4840,1900 4846.2,1893.8 4846.2,1853.8 4850,1850 5085,1850 5115,1880
GND on Top Layer "Top Layer-GND 2" (solid, remove dead copper, pour order 24): 5115,3350 5190,3425 5190,3465 5180,3475 5050,3475 5040,3465 4505,3465 4495,3455 4495,3301.67 4521.67,3275 4838.25,3275 4846.2,3267.05 4846.2,3223.8 4850,3220 5085,3220 5115,3250
48V on Top Layer "NONET_L01_P-001" (solid, remove dead copper, pour order 58): 2515,4315 2530,4300 2530,3615 2505,3590 2340,3590 2315,3615 2315,3800 2245,3870 2110,3870 2070,3910 2070,4240 2145,4315
48V on Top Layer "Top Layer-48V 1" (solid, remove dead copper, pour order 57): 4875,3975 4895,3995 4895,4320 4865,4350 4655,4350 4560,4255 4460,4255 4425,4220 4425,3970 4465,3930 4830,3930
48V on Top Layer "NONET_L01_P-001" (solid, remove dead copper, pour order 54): 3250,4195 3425,4195 3515,4285 3680,4285 3695,4270 3695,4040 3650,3995 3590,3995 3445,3850 3280,3850 3240,3890 3240,4185 3245,4190
GND on Top Layer "Top Layer-GND 4" (solid, remove dead copper, pour order 53): 2035,425 2050,410 2220,410 2235,425 2235,600 2210,625 2065,625 2035,595 2035,590
GND on Top Layer "NONET_L01_P-001" (solid, remove dead copper, pour order 49): 1845,875 1855,865 1855,670 1845,660 1725,660 1705,680 1705,725 1640,790 1523.41,790 1515,798.41 1515,870 1520,875
48V on Top Layer "NONET_L01_P-001" (solid, remove dead copper, pour order 45): 1455,3835 1470,3835 1480,3825 1480,3650 1470,3640 1415,3640 1405,3650 1405,3705 1445,3745 1445,3825
GND on Top Layer "Top Layer-GND 5" (solid, remove dead copper, pour order 44): 417.41,3990 468.3,3896.7 645,3720 1240,3720 1290,3770 1290,4165 1275,4180 890,4180 875,4165 875,4055 895.67,4034.33 970.67,4034.33 990,4015 990,3890 959.2,3859.2 640.8,3859.2 565,3935 565,4465 530,4500 139.23,4500 35,4395.77 35,4005 50,3990
5V on Top Layer "NONET_L01_P-001" (solid, remove dead copper, pour order 41): 600,4470 775,4470 790,4455 790,4025 815,4000 950,4000 960,3990 960,3905.22 939.78,3885 645,3885 590.8,3939.2 590.8,4460.8
GND on Top Layer "NONET_L01_P-001" (solid, remove dead copper, pour order 36): 4787.85,1119.44 5490.56,1119.44 5510,1100 5510,955 5490,935 4780,935 4765,950 4765,1095 4787.85,1117.85
NetL3_2 on Top Layer "Top Layer-NetL3_2" (solid, remove dead copper, pour order 35): 5490,2025 5515,2000 5515,1520 5540,1495 5710,1495 5740,1525 5740,2125 5685,2180 5445,2180 5435,2170 5435,2080 5435,2045 5455,2025
SW3 on Top Layer "NONET_L01_P-001" (solid, remove dead copper, pour order 33): 4685,1480 4735,1480 4750,1495 4750,1575 4802.7,1627.7 4837.3,1627.7 4850,1615 4850,1565 4860,1555 5210,1555 5235,1580 5235,1790 5210,1815 4730,1815 4705,1790 4705,1530 4680,1505 4680,1485
48V on Top Layer "NONET_L01_P-001" (solid, remove dead copper, pour order 32): 4690,1415 4755,1415 4785,1445 4785,1497.7 4803.3,1516 4999,1516 5010,1505 5010,1380 5020,1370 5485,1370 5520,1335 5520,1200 5490,1170 4798.41,1170 4787.85,1180.56 4787.85,1312.15 4710,1390 4690,1390 4685,1395 4685,1410
GND on Top Layer "NONET_L01_P-001" (solid, remove dead copper, pour order 31): 4787.85,2489.44 5490.56,2489.44 5510,2470 5510,2390 5490,2370 4785,2370 4765,2390 4765,2465 4787.85,2487.85
NetL2_2 on Top Layer "Top Layer-NetL2_2" (solid, remove dead copper, pour order 29): 5490,3395 5515,3370 5515,2890 5540,2865 5675,2865 5710,2900 5710,3605 5685,3630 5465,3630 5435,3600 5435,3450 5435,3415 5455,3395
SW2 on Top Layer "NONET_L01_P-001" (solid, remove dead copper, pour order 20): 4685,2850 4735,2850 4750,2865 4750,2945 4802.7,2997.7 4837.3,2997.7 4850,2985 4850,2935 4860,2925 5210,2925 5235,2950 5235,3160 5210,3185 4730,3185 4705,3160 4705,2900 4680,2875 4680,2855
48V on Top Layer "NONET_L01_P-001" (solid, remove dead copper, pour order 19): 4690,2785 4755,2785 4785,2815 4785,2867.7 4803.3,2886 4999,2886 5010,2875 5010,2750 5020,2740 5485,2740 5520,2705 5520,2570 5490,2540 4798.41,2540 4787.85,2550.56 4787.85,2682.15 4710,2760 4690,2760 4685,2765 4685,2780
GND on Top Layer "NONET_L01_P-001" (solid, remove dead copper, pour order 14): 770,2405 775,2400 775,2330 805,2300 1130,2300 1145,2285 1145,2085 1130,2070 626,2070 621,2065 475,2065 465,2075 465,2195 480,2210 590,2320 590,2390 605,2405
SW1 on Top Layer "Top Layer-SW1" (solid, remove dead copper, pour order 6): 850,2445 915,2510 915,2708.78 930,2723.78 930,2775 880,2775 875,2770 875,2704.6 840.47,2670.07 840.47,2645.47 840.47,2632.97 829.34,2627.3 797.7,2627.3 775,2650 775,2680 765,2690 525,2690 425,2790 225,2790 195,2760 195,2485 235,2445 490,2445
NetL1_2 on Top Layer "NONET_L01_P-001" (solid, remove dead copper, pour order 8): 430,2325 445,2310 445,2080 435,2070 95,2070 80,2085 80,2310 95,2325
48V on Top Layer "NONET_L01_P-001" (solid, remove dead copper, pour order 0): 645.2,2734 826.7,2734 843.4,2750.7 843.4,2808.4 870,2835 915,2835 925,2845 925,2860 916.4,2868.6 886.4,2868.6 835,2920 835,3050 820,3065 430,3065 395,3100 325,3100 310,3085 310,2885 310,2820 435,2820 435,2830 450,2845 590,2845 615,2820 615,2745 625,2735 635,2735
GND on Bottom Layer "Bottom Layer-GND" (solid, remove dead copper, pour order 109): 10,130 115,25 5665,25 5765,125 5765,560 5725,600 5210,600 5175,565 5175,260 5080,165 795,165 720,240 720,765 660,825 120,825 85,860 85,3695 440,4050 440,4255 655,4470 1590,4470 1750,4310 4910,4310 4955,4265 4955,3605 5045,3515 5440,3515 5515,3440 5515,3335 5365,3185 4855,3185 4825,3155 4825,2855 4890,2790 5445,2790 5550,2685 5550,2425 5580,2395 5755,2395 5780,2420 5780,4405 5665,4520 125,4520 10,4405
5V on Bottom Layer "NONET_L01_P-001" (solid, remove dead copper, pour order 75): 759.42,4100.58 790,4070 790,3940 320,3470 320,1130 280,1090 150,1090 115,1125 115,3605 510,4000 510,4070 540.58,4100.58
48V on Bottom Layer "Bottom Layer-48V" (solid, remove dead copper, pour order 152): 360,2880 390,2850 740,2850 832.15,2942.15 832.15,3127.15 880,3175 1430,3175 1460,3145 1460,2095 785,1420 785,250 840,195 5060,195 5140,275 5140,815 5245,920 5375,920 5430.63,975.63 5430.63,1334.37 5375,1390 4830,1390 4805,1365 4805,1260 4675,1130 4465,1130 4405,1190 4405,1730 4665,1990 4965,1990 5060,2085 5370,2085 5520,2235 5520,2680 5450,2750 4815,2750 4780,2715 4780,2563.63 4691.37,2475 4445,2475 4385,2535 4385,3502.5 4527,3680 4870,3680 4905,3715 4905,4235 4885,4255 4255,4255 4225,4225 4225,4080 4185,4040 3495,4040 3410,4125 3115,4125 3045,4055 2915,4055 2870,4100 2870,4240 2840,4270 1770,4270 1080,3580 545,3580 360,3395
16-3V on Bottom Layer "Bottom Layer-16-3V" (solid, remove dead copper, pour order 104): 5205,670 5230,645 5675,645 5750,720 5750,2335 5730,2355 5565,2355 5550,2340 5550,2190 5480,2120 5480,960 5400,880 5245,880 5205,840
GND on GND03 (split plane): 5771.87,4404.43 5771.87,126.43 5665.53,20.1 126.43,20.1 20.1,126.43 20.1,4401.12 130.37,4511.4 5664.9,4511.4
GND on GND02 (split plane): 5771.87,4404.43 5771.87,126.43 5665.53,20.1 126.43,20.1 20.1,126.43 20.1,4401.12 130.37,4511.4 5664.9,4511.4

## Silkscreen, mask and mechanical layers (free items; w line width, h text height)
Top Overlay:
  rectangle: 2700,1990 2945,2540
  region: 2490,2540 2820,2870 3165,2540
  lines w10: 1480.32,1354.33 4212.6,1354.33 4212.6,3389.76 1480.32,3389.76 1480.32,1354.33
  text "CAN4" at 3975,3970 h60
  text "TXP" at 363.94,3918.94 h23.62
  text "TXN" at 363.94,3848.94 h23.62
  text "16V-2" at 4925,3840 h60
  text "L" at 1750,3800 h40
  text "L" at 2900,3800 h40
  text "RXP" at 368.94,3768.94 h23.62
  text "16V-2-LED" at 4165,3740 h39.37
  text "H" at 1750,3735 h40
  text "H" at 2900,3725 h40
  text "TXP" at 713.94,3638.94 h23.62
  text "CAN3" at 1825,3605 h60
  text "CAN4" at 2975,3605 h60
  text "TXN" at 713.94,3603.94 h23.62
  text "RXP" at 718.94,3568.94 h23.62
  text "RXN" at 373.94,3533.94 h23.62
  text "RXN" at 718.94,3528.94 h23.62
  text "5V-LED" at 975,3520 h30
  text "GND" at 718.94,3488.94 h23.62
  text "网口通信" at 440,3361.43 h70.87
  text "12V" at 1225,1855 h60
  text "+" at 680,1770 h60
  text "-" at 785,1770.01 h60
  text "+" at 1150,1765 h60
  text "-" at 1245,1765.01 h60
  text "12V-LED" at 125,1650 h30 r90
  text "16V-3-LED" at 5515,1130 h30
  text "5V" at 253.94,988.94 h23.62
  text "D" at 288.94,938.94 h23.62
  text "CAN1" at 1520,900 h60
  text "ENA" at 293.94,888.94 h23.62
  text "ENB" at 293.94,848.94 h23.62
  text "H" at 1980,815 h40
  text "H" at 4735,815 h40
  text "48V" at 2295,805 h60
  text "EtherCAT急停" at 265,761.17 h70.87
  text "L" at 4735,755 h40
  text "L" at 1985,750 h40
  text "CAN2" at 4805,730 h60
  text "48V-LED" at 325,640 h30
  text "16V-3" at 5095,360 h60
Mechanical 1:
  lines w10: 6456.69,4531.5 6460.63,4531.5 ; 6579.37,4411.5 6579.37,4412.76 ; 0,118.11 118.11,0 ; 0,118.11 0,4409.45 ; 0,118.11 0,4409.45 ; 0,118.11 118.11,0 ; 0,4409.45 122.05,4531.5 ; 0,4409.45 122.05,4531.5 ; 118.11,0 5673.86,0 ; 118.11,0 5673.86,0 ; 122.05,4531.5 5673.23,4531.5 ; 122.05,4531.5 5673.23,4531.5 ; 5673.23,4531.5 5791.97,4412.76 ; 5673.23,4531.5 5791.97,4412.76 ; 5673.86,0 5791.97,118.11 ; 5673.86,0 5791.97,118.11 ; 5791.97,118.11 5791.97,4412.76 ; 5791.97,118.11 5791.97,4412.76
Mechanical 8:
  the board outline again, w10
Drill Drawing:
  circle w10: c-1309.38,6037.27 r20
  circle w10: c-1309.38,6037.27 r33.33
  lines w10: -1342.71,5703.94 -1309.38,5720.61 -1276.04,5703.94 -1292.71,5737.27 -1276.04,5770.61 -1309.38,5753.94 -1342.71,5770.61 -1326.04,5737.27 -1342.71,5703.94 ; -1342.71,5920.61 -1276.04,5920.61 -1309.38,5853.94 -1342.71,5920.61 ; -1342.71,6153.94 -1276.04,6153.94 -1276.04,6220.61 -1342.71,6220.61 -1342.71,6153.94 ; -1342.71,6320.61 -1326.04,6320.61 -1326.04,6303.94 -1292.71,6303.94 -1292.71,6320.61 -1276.04,6320.61 -1276.04,6353.94 -1292.71,6353.94 -1292.71,6370.61 -1326.04,6370.61 -1326.04,6353.94 -1342.71,6353.94 -1342.71,6320.61 ; -1342.71,6520.61 -1276.04,6520.61 -1309.38,6453.94 -1342.71,6520.61 ; -1342.71,6603.94 -1276.04,6603.94 -1276.04,6670.61 -1342.71,6670.61 -1342.71,6603.94 ; -1342.71,6770.61 -1326.04,6770.61 -1309.38,6753.94 -1292.71,6770.61 -1276.04,6770.61 -1292.71,6787.27 -1276.04,6803.94 -1292.71,6803.94 -1309.38,6820.61 -1326.04,6803.94 -1342.71,6803.94 -1326.04,6787.27 -1342.71,6770.61 ; -1342.71,6903.94 -1342.71,6920.61 -1326.04,6937.27 -1342.71,6953.94 -1342.71,6970.61 -1326.04,6970.61 -1309.38,6953.94 -1292.71,6970.61 -1276.04,6970.61 -1276.04,6953.94 -1292.71,6937.27 -1276.04,6920.61 -1276.04,6903.94 -1292.71,6903.94 -1309.38,6920.61 -1326.04,6903.94 -1342.71,6903.94 ; -1342.71,7087.27 -1309.38,7053.94 -1276.04,7087.27 -1309.38,7120.61 -1342.71,7087.27 ; -1329.38,6167.27 -1289.38,6167.27 -1289.38,6207.27 -1329.38,6207.27 -1329.38,6167.27 ; -1329.38,6507.27 -1289.38,6507.27 -1309.38,6467.27 -1329.38,6507.27
  lines w15: -1402.5,5658.94 10908,5658.94 ; -1402.5,7158.94 10908,7158.94 ; -851.62,5508.94 -851.62,7308.94 ; -201.8,5508.94 -201.8,7308.94 ; 947.86,5508.94 947.86,7308.94 ; 1453.74,5508.94 1453.74,7308.94 ; 2187.54,5508.94 2187.54,7308.94 ; 3687.09,5508.94 3687.09,7308.94 ; 4276.94,5508.94 4276.94,7308.94 ; 5022.74,5508.94 5022.74,7308.94 ; 7342.02,5508.94 7342.02,7308.94 ; 8195.79,5508.94 8195.79,7308.94 ; 9529.4,5508.94 9529.4,7308.94 ; -1402.5,5508.94 10908,5508.94 10908,7308.94 -1402.5,7308.94 -1402.5,5508.94
  text "Symbol" at -1312.5,7203.94 h72
  text "Count" at -806.62,7203.94 h72
  text "Hole Size" at -156.8,7203.94 h72
  text "Plated" at 992.86,7203.94 h72
  text "Hole Type" at 1498.74,7203.94 h72
  text "Drill Layer Pair" at 2232.54,7203.94 h72
  text "Via/Pad" at 3732.09,7203.94 h72
  text "Pad Shape" at 4321.94,7203.94 h72
  text "Template" at 5067.74,7203.94 h72
  text "Description" at 7387.02,7203.94 h72
  text "Hole Tolerance (+)" at 8240.79,7203.94 h72
  text "Hole Tolerance (-)" at 9574.4,7203.94 h72
  text "4" at -806.62,7053.94 h60
  text "23.62mil (0.600mm)" at -156.8,7053.94 h60
  text "PTH" at 992.86,7053.94 h60
  text "Slot" at 1498.74,7053.94 h60
  text "Top Layer - Bottom Layer" at 2232.54,7053.94 h60
  text "Pad" at 3732.09,7053.94 h60
  text "Rounded" at 4321.94,7053.94 h60
  text "r120_220h60_160r100m125_225mx125_225p0" at 5067.74,7053.94 h60
  text "4" at -806.62,6903.94 h60
  text "70.87mil (1.800mm)" at -156.8,6903.94 h60
  text "PTH" at 992.86,6903.94 h60
  text "Round" at 1498.74,6903.94 h60
  text "Top Layer - Bottom Layer" at 2232.54,6903.94 h60
  text "Pad" at 3732.09,6903.94 h60
  text "(Mixed)" at 4321.94,6903.94 h60
  text "(Mixed)" at 5067.74,6903.94 h60
  text "4" at -806.62,6753.94 h60
  text "86.61mil (2.200mm)" at -156.8,6753.94 h60
  text "PTH" at 992.86,6753.94 h60
  text "Round" at 1498.74,6753.94 h60
  text "Top Layer - Bottom Layer" at 2232.54,6753.94 h60
  text "Pad" at 3732.09,6753.94 h60
  text "Rounded" at 4321.94,6753.94 h60
  text "c380h220m0mx0" at 5067.74,6753.94 h60
  text "4" at -806.62,6603.94 h60
  text "110.20mil (2.799mm)" at -156.8,6603.94 h60
  text "PTH" at 992.86,6603.94 h60
  text "Round" at 1498.74,6603.94 h60
  text "Top Layer - Bottom Layer" at 2232.54,6603.94 h60
  text "Pad" at 3732.09,6603.94 h60
  text "Rounded" at 4321.94,6603.94 h60
  text "c380h280m0mx0" at 5067.74,6603.94 h60
  text "4" at -806.62,6453.94 h60
  text "114.17mil (2.900mm)" at -156.8,6453.94 h60
  text "PTH" at 992.86,6453.94 h60
  text "Round" at 1498.74,6453.94 h60
  text "Top Layer - Bottom Layer" at 2232.54,6453.94 h60
  text "Pad" at 3732.09,6453.94 h60
  text "Rounded" at 4321.94,6453.94 h60
  text "(Mixed)" at 5067.74,6453.94 h60
  text "4" at -806.62,6303.94 h60
  text "133.86mil (3.400mm)" at -156.8,6303.94 h60
  text "PTH" at 992.86,6303.94 h60
  text "Round" at 1498.74,6303.94 h60
  text "Top Layer - Bottom Layer" at 2232.54,6303.94 h60
  text "Pad" at 3732.09,6303.94 h60
  text "Rounded" at 4321.94,6303.94 h60
  text "c600h340m0mx0" at 5067.74,6303.94 h60
  text "10" at -806.62,6153.94 h60
  text "36.00mil (0.914mm)" at -156.8,6153.94 h60
  text "PTH" at 992.86,6153.94 h60
  text "Round" at 1498.74,6153.94 h60
  text "Top Layer - Bottom Layer" at 2232.54,6153.94 h60
  text "Pad" at 3732.09,6153.94 h60
  text "Rounded" at 4321.94,6153.94 h60
  text "c152h91o0_0m157mx157p0" at 5067.74,6153.94 h60
  text "10" at -806.62,6003.94 h60
  text "74.80mil (1.900mm)" at -156.8,6003.94 h60
  text "PTH" at 992.86,6003.94 h60
  text "Round" at 1498.74,6003.94 h60
  text "Top Layer - Bottom Layer" at 2232.54,6003.94 h60
  text "Pad" at 3732.09,6003.94 h60
  text "Rounded" at 4321.94,6003.94 h60
  text "(Mixed)" at 5067.74,6003.94 h60
  text "20" at -806.62,5853.94 h60
  text "39.37mil (1.000mm)" at -156.8,5853.94 h60
  text "PTH" at 992.86,5853.94 h60
  text "Round" at 1498.74,5853.94 h60
  text "Top Layer - Bottom Layer" at 2232.54,5853.94 h60
  text "Pad" at 3732.09,5853.94 h60
  text "Rounded" at 4321.94,5853.94 h60
  text "c160h100o0_0m0mx0_4063987503" at 5067.74,5853.94 h60
  text "1202" at -806.62,5703.94 h60
  text "12.00mil (0.305mm)" at -156.8,5703.94 h60
  text "PTH" at 992.86,5703.94 h60
  text "Round" at 1498.74,5703.94 h60
  text "Top Layer - Bottom Layer" at 2232.54,5703.94 h60
  text "Via" at 3732.09,5703.94 h60
  text "Rounded" at 4321.94,5703.94 h60
  text "v61h30m0mx0" at 5067.74,5703.94 h60
  text "1266 Total" at -806.62,5553.94 h60
  text "Slot definitions :" at -1312.5,5408.97 h60
  text "Routed Path Length" at -279.81,5408.97 h60
  text "= Calculated from tool start centre position to tool end centre position." at 822.86,5408.97 h60
  text "Hole Length" at -279.81,5308.99 h60
  text "= Routed Path Length + Tool Size = Slot length as defined in the PCB layout" at 412.99,5308.99 h60

## Text inside footprints (layer, text, board x,y; h text height)
U1: Top Overlay "+" at 2393.58,563.39 h30 r180; Top Overlay "-" at 2828.58,553.39 h30 r180
U8: Top Overlay "+" at 3058.94,563.39 h30 r180; Top Overlay "-" at 3493.93,553.39 h30 r180
U10: Top Overlay "+" at 598.56,1228 h39.4 r90; Top Overlay "-" at 596.69,1018 h39.4 r90
U12: Top Overlay "+" at 5337.7,826.53 h30 r90
U19: Top Overlay "+" at 5337.71,4074.57 h30 r90
U20: Top Overlay "+" at 298.56,1678 h39.4 r90; Top Overlay "-" at 306.69,1433 h39.4 r90